# Altium PCB GNT604CPUR4.PCBDOC
Units mm, origin at the board's own origin, x right, y up, seen from the top; angles counter-clockwise.
Board outline 63 x 65.5 mm, 2 copper layers (Top Layer, Bottom Layer); 99 components, 67 nets, 288 pads, 76 vias.
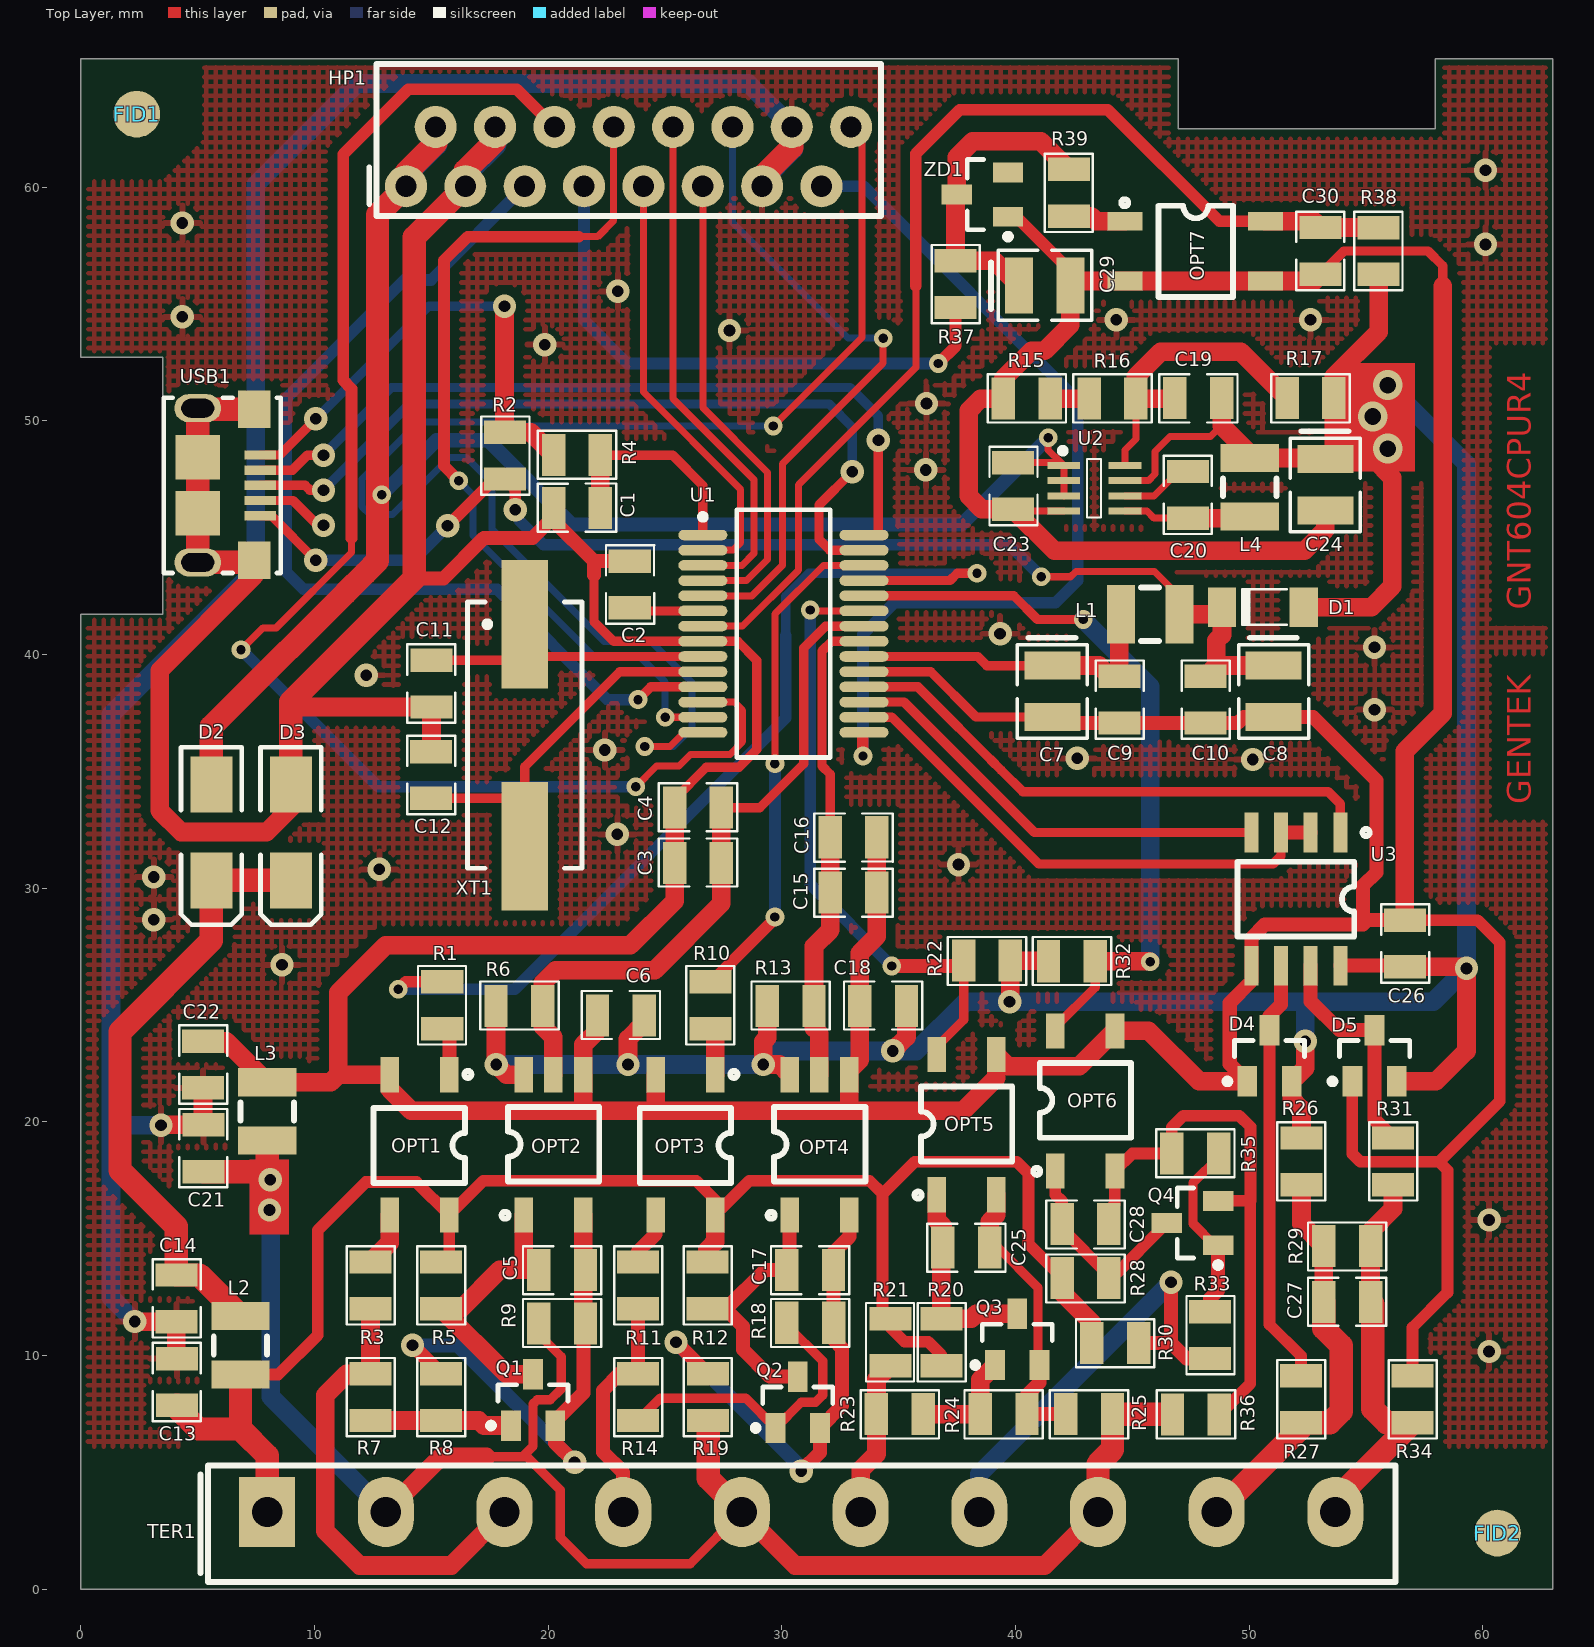
[diagram p0: Top Layer view]
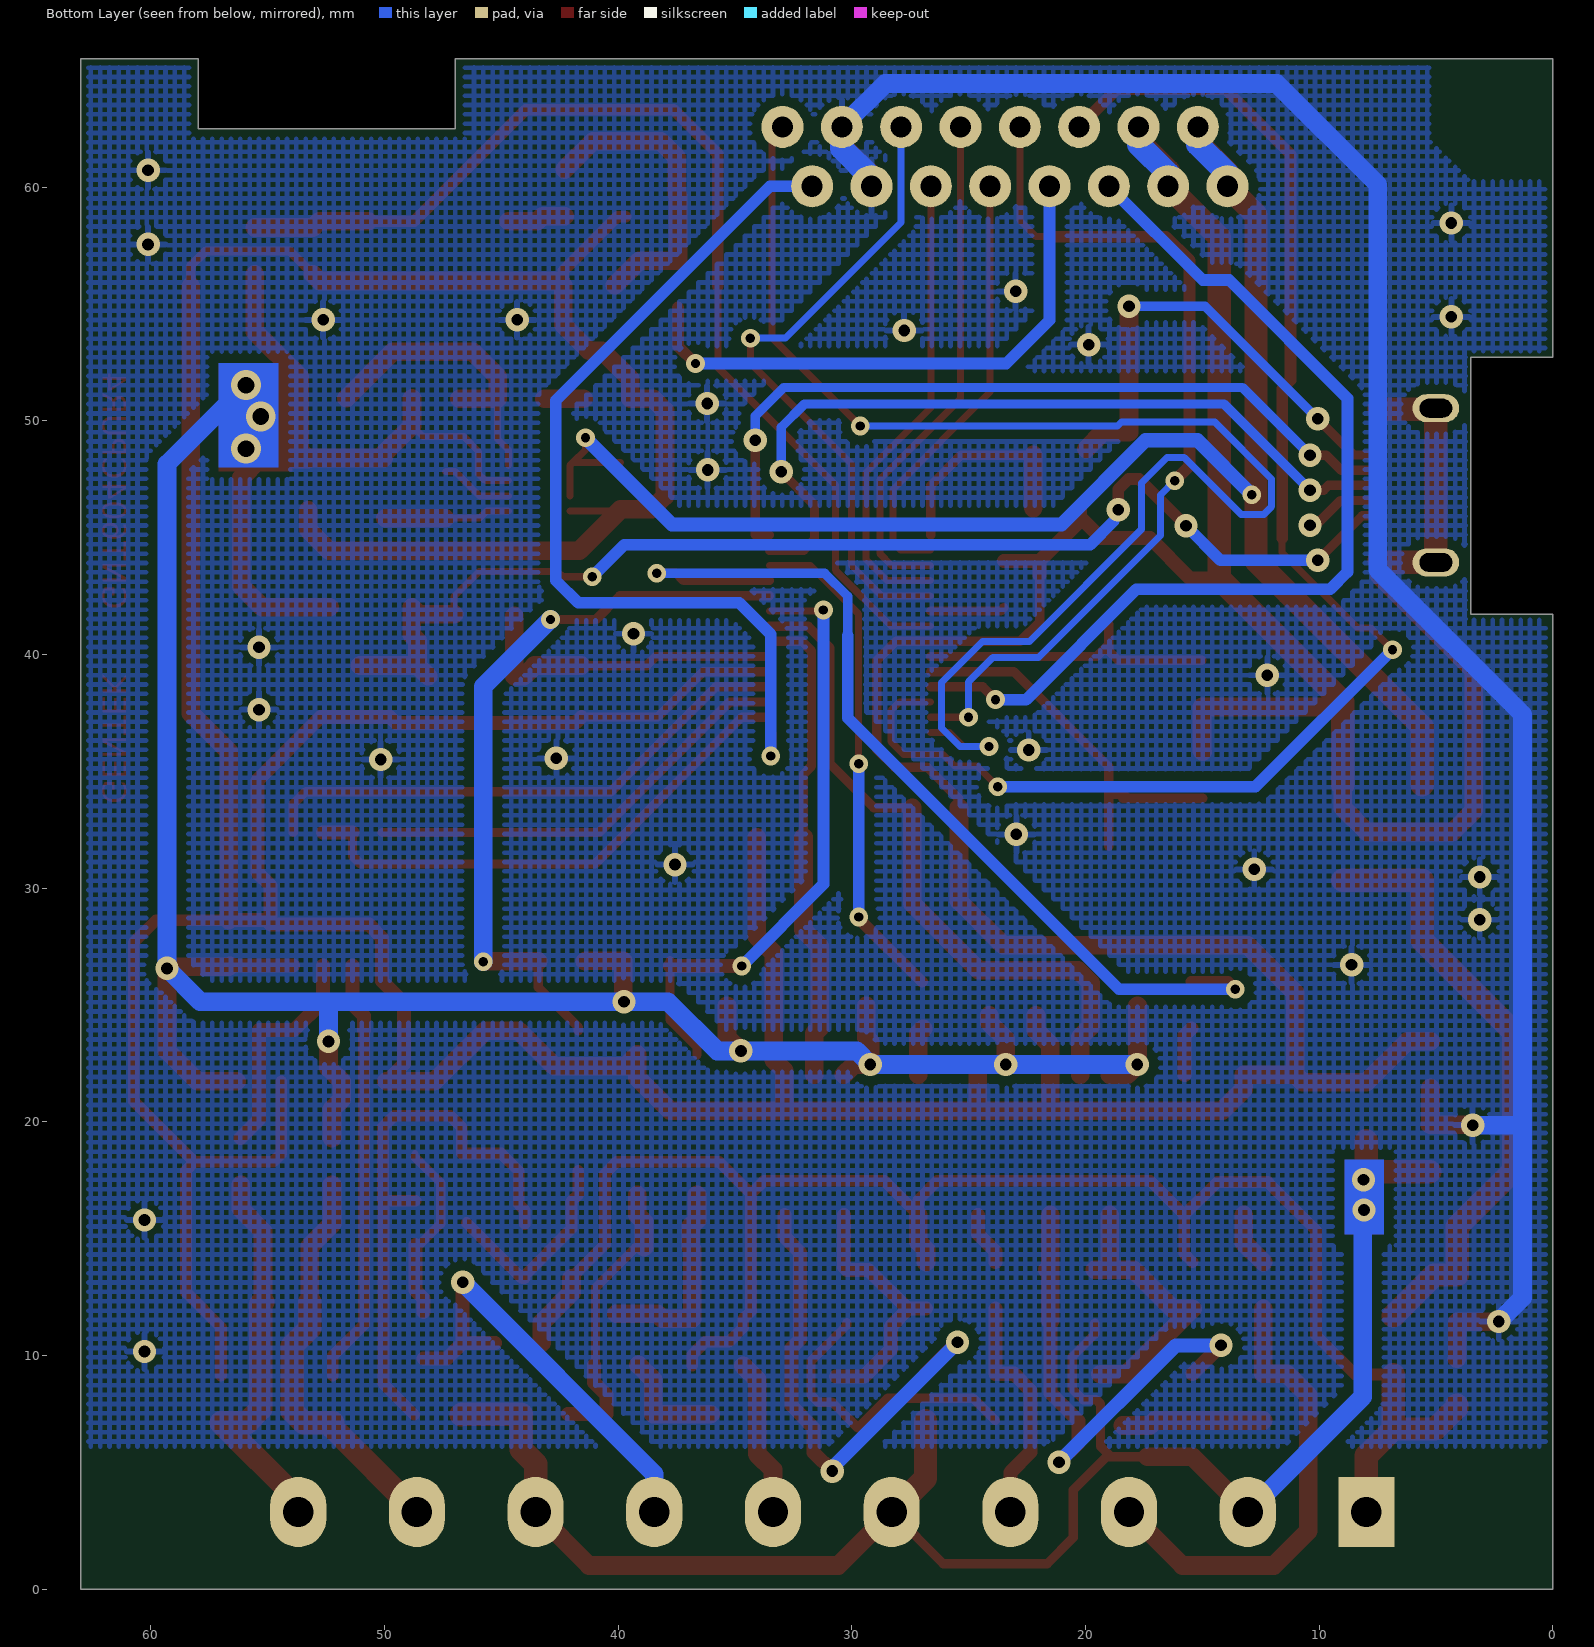
[diagram p1: Bottom Layer view, seen from below]

## Layer stack, top to bottom
Top Layer: signal copper 0.0356
Dielectric: dielectric 0.32, FR-4, Dk 4.8
Bottom Layer: signal copper 0.0356

## Board outline
0,0 63,0 63,65.5 57.969,65.5 57.969,62.5 46.969,62.5 46.969,65.5 0,65.5 0,52.73 3.5,52.73 3.5,41.732 0,41.732

## Design rules (kind name [scope] priority, off if disabled: settings)
Clearance [All] p1: gap=0.2
ComponentClearance [All] p1 off: gap=0.254 collisioncheckmode=3 verticalgap=0.254 showdistances=FALSE
FabricationTestPointUsage TestPointUsage [All] p1: valid=0 allowmultiple=FALSE
FabricationTestpoint Testpoint [All] p1: side=3 testpointundercomponent=TRUE minsize=1.016 maxsize=2.54 preferedsize=1.524 minholesize=0 maxholesize=1.016 preferedholesize=0.813 testpointgrid=0.025 allowsidetop=TRUE allowsidebottom=TRUE usegrid=TRUE gridtolerance=0
HoleSize [All] p1: absolutevalues=TRUE maxlimit=10 minlimit=0.025 maxpercent=80.000 minpercent=20.000
PolygonConnect [All] p1: connectstyle=Relief reliefconductorwidth=0.254 reliefentries=4 polygonreliefangle="90 Angle" airgapwidth=0.254
RoutingTopology [All] p1: topology=Horizontal
RoutingVias [All] p1: holewidth=0.4 width=0.8 viastyle="Through Hole" minholewidth=0.4 minwidth=0.8 maxholewidth=0.4 maxwidth=0.8
SilkToSolderMaskClearance SilkscreenOverComponentPads [IsPad] p1: minsilkscreentomaskgap=0.254 clearancetoexposedcopper=TRUE
SolderMaskExpansion [All] p1: expansion=0.102
Width [All] p1: maxlimit=3 minlimit=0.254 preferedwidth=0.3 minimp=50.000000 maximp=50.000000 favimp=50.000000
22 further rules are at their usual default settings.

## Components (designator, comment, footprint, x,y, rotation, side; value= is the part's Value field where it differs from the comment)
C1 "100nF" CC0805 21.234,46.279 r180 top
C2 "100nF" CC0805 23.495,43.002 r90 top
C3 "100pF" CC0805 26.416,31.09 r180 top
C4 "10nF" CC0805 26.416,33.45 r180 top
C5 "10nF" CC0805 20.599,13.665 r0 top
C6 "100nF" CC0805 23.114,24.562 r180 top
C7 "47uF/10V" CAPSMDTANTAL-B 41.58,38.43 r270 top
C8 "47uF/10V" CAPSMDTANTAL-B 51.054,38.43 r270 top
C9 "100nF" CC0805 44.45,38.071 r90 top
C10 "100nF" CC0805 48.133,38.071 r90 top
C11 "22pF" CC0805 15.011,38.76 r270 top
C12 "22pF" CC0805 14.985,34.849 r90 top
C13 "100nF" CC0805 4.115,8.865 r270 top
C14 "100nF" CC0805 4.088,12.446 r90 top
C15 "100pF" CC0805 33.071,29.821 r0 top
C16 "10nF" CC0805 33.071,32.182 r0 top
C17 "10nF" CC0805 31.217,13.665 r0 top
C18 "100nF" CC0805 34.341,24.967 r180 top
C19 "47pF" CC0805 47.828,50.978 r0 top
C20 "470nF" CC0805 47.396,46.838 r270 top
C21 "100nF" CC0805 5.258,18.872 r270 top
C22 "100nF" CC0805 5.231,22.454 r90 top
C23 "100nF" CC0805 39.903,47.219 r90 top
C24 "47uF/10V" CAPSMDTANTAL-B 53.264,47.269 r270 top
C25 "100nF" CC0805 37.897,14.63 r0 top
C26 "100nF" CC0805 56.667,27.635 r90 top
C27 "47pF" CC0805 54.202,12.294 r180 top
C28 "100nF" CC0805 43.001,15.621 r0 top
C29 "47uF/10V" CAPSMDTANTAL-B 41.25,55.804 r0 top
C30 "100nF" CC0805 53.061,57.278 r270 top
D1 "LL4148" CD-SOD80 52.248,42.037 r180 top
D2 "M7" CD-SMA_DO214 5.588,32.385 r270 top
D3 "US1M" CD-SMA_DO214 8.992,32.385 r270 top
D4 "BAV99" SOT23_N 50.876,22.784 r90 top
D5 "BAV99" SOT23_N 55.372,22.784 r90 top
FID1 "FIDUCIAL1" FIDUCIAL1 2.388,63.119 r0 top
FID2 "FIDUCIAL1" FIDUCIAL1 60.63,2.388 r0 top
HP1 "DS1015-05_CONFLY" HeaderAntenk90Pin16 13.919,60.046 r0 top (schematic designator HP2)
L1 "47uH" INDC2.5X3.3 45.771,41.732 r0 top
L2 "47uH" INDC2.5X3.3 6.833,10.439 r90 top
L3 "47uH" INDC2.5X3.3 7.976,20.447 r90 top
L4 "47uH" INDC2.5X3.3 50.038,47.168 r90 top
OPT1 "PC357" SO-4 14.503,19.011 r270 top
OPT2 "PC410" SO-5 18.955,16.017 r90 top
OPT3 "PC357" SO-4 25.889,19.011 r270 top
OPT4 "PC410" SO-5 30.341,16.017 r90 top
OPT5 "PC357" SO-4 37.897,19.887 r90 top
OPT6 "PC357" SO-4 42.977,20.904 r90 top
OPT7 "PC357" SO-4 47.701,57.277 r0 top
Q1 "BC817" SOT23_N 19.355,8.052 r90 top
Q2 "BC817" SOT23_N 30.683,7.95 r90 top
Q3 "BC817" SOT23_N 40.081,10.643 r90 top
Q4 "BC817" SOT23_N 47.625,15.672 r180 top
R1 "470R" CR0805 15.469,24.992 r270 top
R2 "10K" CR0805 18.161,48.514 r90 top
R3 "10K" CR0805 12.395,13.003 r90 top
R4 "100R" CR0805 21.234,48.539 r180 top
R5 "2.2K" CR0805 15.418,13.005 r90 top
R6 "1K" CR0805 18.771,24.968 r180 top
R7 "10K" CR0805 12.395,8.22 r90 top
R8 "10K" CR0805 15.418,8.22 r90 top
R9 "10R" CR0805 20.599,11.379 r180 top
R10 "470R" CR0805 26.949,24.992 r270 top
R11 "10K" CR0805 23.851,13.005 r90 top
R12 "2.2K" CR0805 26.824,13.005 r90 top
R13 "1K" CR0805 30.378,24.968 r180 top
R14 "10K" CR0805 23.851,8.22 r90 top
R15 "120K" CR0805 40.488,50.952 r180 top
R16 "10K" CR0805 44.158,50.954 r180 top
R17 "390K" CR0805 52.629,50.978 r0 top
R18 "10K" CR0805 31.218,11.403 r0 top
R19 "10R" CR0805 26.848,8.219 r270 top
R20 "2.2K" CR0805 36.83,10.569 r90 top
R21 "10K" CR0805 34.646,10.567 r270 top
R22 "10K" CR0805 38.786,26.899 r0 top
R23 "10K" CR0805 35.052,7.492 r0 top
R24 "10K" CR0805 39.497,7.492 r0 top
R25 "10R" CR0805 43.155,7.492 r0 top
R26 "10K" CR0805 52.246,18.312 r270 top
R27 "10R" CR0805 52.222,8.129 r90 top
R28 "2.2K" CR0805 43.002,13.31 r0 top
R29 "10K" CR0805 54.204,14.681 r0 top
R30 "10K" CR0805 44.272,10.541 r0 top
R31 "10R" CR0805 56.159,18.313 r90 top
R32 "10K" CR0805 42.418,26.875 r180 top
R33 "10K" CR0805 48.337,10.871 r90 top
R34 "10K" CR0805 56.998,8.128 r90 top
R35 "10K" CR0805 47.699,18.644 r180 top
R36 "10R" CR0805 47.727,7.468 r180 top
R37 "2,2K" CR0805 37.44,55.855 r90 top
R38 "10K" CR0805 55.55,57.277 r270 top
R39 "100R" CR0805 42.291,59.766 r270 top
TER1 "Terminal_H5.08x10" Terminal_H5.08x10 7.976,3.302 r0 top
U1 "PIC18F25K80-I/SS" SSOP-SS28_N 30.074,40.894 r0 top
U2 "LT3470ETS8" TS8_N 43.383,47.117 r0 top
U3 "SN75176BDR" SO-8 53.924,32.385 r270 top
USB1 "USB_MICRO" MICRO_USB 6.341,47.246 r0 top
XT1 "20MHz" HC49/4H_SMX 18.999,36.551 r270 top
ZD1 "ZNR5V1" SOT23_N 38.633,59.69 r180 top

## Footprints (in the part's own frame and the unit in brackets; to place one, negate y for a bottom-side part, rotate by r counter-clockwise, add the part's x,y. Pads: shape width x height; smd on the part's side, far side on the other; paste and mask are expansions set on the pad)
CAPSMDTANTAL-B [mm]
  rect 1.2x2.4 smd: 1(-1.1,0) 2(1.1,0)
  silkscreen extent -2.29,-1.5 2.01,1.5, body extent -1.82,-1.4 1.81,1.4, height 2
CC0805 [mm]
  rect 1x1.8 smd: 1(-1,0) 2(1,0)
  silkscreen extent -1.68,-1.04 1.68,1.01, body extent -1.12,-0.76 1.19,0.76, height 1
CD-SMA_DO214 [mm] "DO-214-AC/SMA; 2 C-Bend Leads; Body 5 x 2.7 mm, inc. leads (LxW)"
  rect 2.4x1.8 smd: 1(-2.05,0) 2(2.05,0)
  silkscreen extent -3.65,-1.3 3.95,1.3, body extent -2.69,-0.76 2.79,0.76, height 2
CD-SOD80 [mm]
  rect 1.2x1.7 smd: 1(-0.095,0.005) 2(3.405,0.005)
  silkscreen extent 0.64,-0.76 2.55,0.77, body extent -0.51,-0.76 3.68,0.76, height 2
CR0805 [mm]
  rect 1x1.8 smd: 1(-1,0) 2(1,0)
  silkscreen extent -1.68,-1.04 1.68,1.02, body extent -1.17,-0.76 1.22,0.79, height 0.4
FIDUCIAL1 [mm]
  round 2 smd mask+1: 1(0.003,0.013)
HC49/4H_SMX [mm] "Quartz Crystal, SM; Body 13.4 (inc. leads) x 4.9 mm (LxW max)"
  rect 5.5x2 smd: 1(-4.75,0) 2(4.75,0)
  silkscreen extent -5.7,-2.45 5.7,2.45, body extent -5.59,-2.34 5.59,2.34, height 2
HeaderAntenk90Pin16 [mm]
  round 1.8 hole 0.9: 1(0,0) 2(1.27,2.54) 3(2.54,0) 4(3.81,2.54) 5(5.08,0) 6(6.35,2.54) 7(7.62,0) 8(8.89,2.54) 9(10.16,0) 10(11.43,2.54) 11(12.7,0) 12(13.97,2.54) 13(15.24,0) 14(16.51,2.54) 15(17.78,0) 16(19.05,2.54)
  silkscreen extent -1.57,-1.27 20.32,5.23, body extent -1.02,-1.02 20.07,4.44, height 1
INDC2.5X3.3 [mm] "Chip Inductor, Body 4.5x1.6mm, IPC Low Density"
  rect 1.2x2.5 smd: 1(-1.25,0) 2(1.25,0)
  silkscreen extent -0.39,-1.14 0.38,1.14, body extent -1.86,-1.27 1.85,1.27, height 1.8
MICRO_USB [mm] "Connector; USB2.0, Type A, SM; 5 Position; Right Angle"
  rect 1.35x0.4 smd: 1(1.338,1.3) 2(1.338,0.65) 3(1.338,0) 4(1.338,-0.65) 5(1.338,-1.3)
  oval 2x1.2 hole 0.8 slot 1.4 at 0 deg: 6(-1.338,-3.3) 6(-1.338,3.3)
  rect 1.9x1.9 smd: 6(-1.338,-1.2) 6(-1.338,1.2)
  rect 1.4x1.6 smd: 6(1.088,-3.2) 6(1.088,3.25)
  silkscreen extent -2.79,-3.75 2.21,3.75
SO-4 [mm]
  rect 1.5x0.8 smd: 1(-3.006,1.267) 2(-3.006,-1.283) 3(2.994,-1.283) 4(2.994,1.267)
  silkscreen extent -3.17,-1.97 1.62,2.21, body extent -2.31,-2.31 2.39,2.26, height 1.75
SO-5 [mm]
  rect 1.5x0.8 smd: 1(0,0) 3(0,-2.55) 4(6,-2.55) 5(6,-1.27) 6(6,0)
  silkscreen extent -0.16,-3.23 4.62,0.94, body extent 0.63,-3.56 5.33,1.02, height 1.75
SO-8 [mm]
  rect 1.7x0.6 smd: 1(-0.001,-0.014) 2(-0.001,-1.284) 3(-0.001,-2.554) 4(-0.001,-3.824) 5(5.699,-3.824) 6(5.699,-2.554) 7(5.699,-1.284) 8(5.699,-0.014)
  silkscreen extent -0.15,-4.42 4.45,1.24, body extent 0.63,-4.7 5.08,0.79, height 1.75
SOT23_N [mm] "SOT23, 3-Leads, Body 2.9x1.3mm, Pitch 0.95mm, Lead Span 2.3mm, IPC Medium Density"
  rect 1.3x0.85 smd: 1(-1.05,0.95) 2(-1.05,-0.95) 3(1.143,0)
  silkscreen extent -1.17,-1.5 0.7,1.92, body extent -0.7,-1.5 0.7,1.5, height 1.14
SSOP-SS28_N [mm] "SOP, 28-Leads, Body 10.2x5.2mm, Pitch 0.65mm, IPC Medium Density"
  oval 2.1x0.45 smd: 1(-3.45,4.225) 2(-3.45,3.575) 3(-3.45,2.925) 4(-3.45,2.275) 5(-3.45,1.625) 6(-3.45,0.975) 7(-3.45,0.325) 8(-3.45,-0.325) 9(-3.45,-0.975) 10(-3.45,-1.625) 11(-3.45,-2.275) 12(-3.45,-2.925) 13(-3.45,-3.575) 14(-3.45,-4.225) 15(3.45,-4.225) 16(3.45,-3.575) 17(3.45,-2.925) 18(3.45,-2.275) 19(3.45,-1.625) 20(3.45,-0.975) 21(3.45,-0.325) 22(3.45,0.325) 23(3.45,0.975) 24(3.45,1.625) 25(3.45,2.275) 26(3.45,2.925) 27(3.45,3.575) 28(3.45,4.225)
  silkscreen extent -3.57,-5.3 2,5.3, body extent -2.7,-5.3 2.7,5.3, height 2
Terminal_H5.08x10 [mm]
  rect 2.4x3 hole 1.3: 1(0,0)
  oval 2.4x3 hole 1.3: 2(5.08,0) 3(10.16,0) 4(15.24,0) 5(20.32,0) 6(25.4,0) 7(30.48,0) 8(35.56,0) 9(40.64,0) 10(45.72,0)
  silkscreen extent -2.85,-3 48.3,2, body extent -2.36,-2.82 48.13,1.83, height 2
TS8_N [mm] "SOT23, 5-Leads, Body 3x1.6mm, Pitch 0.95mm, Lead Span 2.8mm, IPC Medium Density"
  rect 1.4x0.3 smd: 1(-1.31,0.975) 2(-1.31,0.325) 3(-1.31,-0.325) 4(-1.31,-0.975) 5(1.31,-0.975) 6(1.31,-0.325) 7(1.31,0.325) 8(1.31,0.975)
  silkscreen extent -1.48,-1.25 0.28,1.73, body extent -0.76,-1.44 0.74,1.46, height 1.45

## Part data
C1 C2 C3 C4 C5 C6 C9 C10 C11 C12 C13 C14 C15 C16 C17 C18 C19 C20 C21 C22 C23 C25 C26 C27 C28 C30: library part CC-0805, "Ceramic Chip Capacitor - Standard"
C7 C8 C24 C29: library part CAPSMDTANTAL-B, "CA45 Chip Tantalum Capacitors"
D1: library part CD-SOD80, "ChipDiode-MiniMELF-SOD80"
D2: library part CD-SMA_DO214, "ChipDiodeSMA"
D3: "ChipDiodeSMA, ultra fast diode"
D4 D5: "Ultrafast, Soft Recovery Diode"
HP1: library part "Header Antenk90PinF16", "Header, 16-Pin, 90 DEGREES"
L1 L2 L3 L4: library part "Inductor Iron_47uH", "Magnetic-Core Inductor_SMD"
OPT1 OPT3 OPT5 OPT6 OPT7: "Optoisolator"
OPT2 OPT4: "Ultra-high Speed Response  OPIC Photocoupler"
Q1 Q2 Q3 Q4: library part BC817-40, "NPN General Purpose Amplifier"
R1 R2 R3 R4 R5 R6 R7 R8 R9 R10 R11 R12 R13 R14 R15 R16 R17 R18 R19 R20 R21 R22 R23 R24 R25 R26 R27 R28 R29 R30 R31 R32 R33 R34 R35 R36 R37 R38 R39: library part CR-0805, "ChipResistor0805"
TER1: "Terminal Block Horizontal 5.08mm 10 pin"
U1: "Flash Microcontroller with 10-Bit A/D and nanoWatt Technology, 32K Flash, 28-Pin SSOP, Industrial Temperature Range, Tape and Reel"
U2: "200mA, Micropower Buck Regulator"
U3: "Low-Power,RS-485/RS-422 Transceiver"
USB1: "Connector; USB2.0, Type A, SM; 5 Position; Right Angle"
XT1: library part XTALL_SMD, "HS-XTALL(SMD)"
ZD1: library part ZENER2-SOT23, "Zener Diode"

## Via types
v1: diameter 1, hole 0.5, Top Layer to Bottom Layer, 52 vias
v2: diameter 0.8, hole 0.4, Top Layer to Bottom Layer, 21 vias
v3: diameter 1.27, hole 0.711, Top Layer to Bottom Layer, 3 vias

## Nets (pads, with @x,y where several pads share a name; then routed paths per layer and width w, separated by ;. In a path a pad name is that pad's centre, name@x,y a point inside that pad or via, vN(x,y) a via of type N, cw(c..) or ccw(c..) an arc to the next point about the centre after c; other vN are vias at no path point)
+5V: C6.1 C18.1 C19.2 C24.1 C26.1 D1.1 D4.2 D5.2 L4.2 OPT2.6 OPT4.6 R6.2 R13.2 R17.2 R22.2 R26.1 R32.2 R38.2 U2.7 U3.8 | length 136.9
  Top Layer w0.3: U2.7 45.689,47.442 45.974,47.727 45.974,48.692 46.609,49.327 48.355,49.327 48.828,49.8
  Top Layer w0.6: U3.8 C26.1@56.617,26.686
  Top Layer w0.8: R6.2 17.771,22.463 v1(17.78,22.454) 18.216,22.017 OPT2.6 ; v1(23.419,22.454) 23.419,23.546 24.114,24.241 C6.1 ; R13.2 29.378,23.597 29.21,23.428 v1(29.21,22.454) 29.904,22.454 OPT4.6 ; v1(34.747,23.038) 35.341,23.631 C18.1 ; v1(39.751,25.146) 39.786,25.181 R22.2 41.394,26.899 R32.2 ; C19.2 48.828,49.8 50.038,48.59 L4.2 53.215,48.418 C24.1 ; R26.1 52.246,20.55 51.826,20.97 D4.2 52.4,22.308 v1(52.4,23.444) ; D1.1 55.24,42.032 56.134,42.926 56.134,47.574 55.339,48.369 C24.1 ; R38.2 55.55,53.823 53.629,51.902 R17.2 53.629,48.734 C24.1 ; D5.2 58.005,21.734 59.309,23.038 v1(59.309,26.568) ; C26.1@56.617,26.686 C26.1 v1@59.242,26.635
  Bottom Layer w0.8: v1(17.78,22.454) v1(23.419,22.454) v1(29.21,22.454) 29.794,23.038 v1(34.747,23.038) 35.763,23.038 37.871,25.146 v1(39.751,25.146) 52.4,25.146 ; v1(52.4,23.444) 52.4,25.146 ; v3(55.931,51.537) 59.309,48.158 v1(59.309,26.568) 57.887,25.146 52.4,25.146
  other v3: 55.931,48.819 55.296,50.19
+18V: C23.2 D2.1 HP1.1 HP1.2 U2.1 U2.2 U2.3 | length 73.7
  Top Layer w0.3: C23.2 U2.1@41.947,48.219 ; v2(41.402,49.276) 41.402,48.763 U2.1@41.947,48.219 ; U2.3 U2.2 U2.1 U2.1@41.947,48.219
  Top Layer w1: D2.1 5.588,36.906 12.167,43.485 ; 11.316,42.634 12.167,43.485 ; HP1.2 15.189,61.9 13.919,60.63 HP1.1 12.7,58.826 12.7,44.018 12.167,43.485
  Bottom Layer w0.6: v2(12.878,46.838) 15.215,49.174 17.424,49.174 21.031,45.568 37.694,45.568 v2(41.402,49.276)
  Bottom Layer w1: HP1.1 13.919,60.579 15.189,61.849 HP1.2
DGND: C1.2 C2.2 C3.2 C4.2 C6.2 C7.2 C8.2 C9.1 C10.1 C11.2 C12.2 C15.2 C16.2 C18.2 C22.2 C23.1 C24.2 C26.2 C29.2 C30.2 D3.1 D4.1 D5.1 HP1.3 HP1.4 L3.2 OPT1.2 OPT2.4 OPT3.2 OPT4.4 OPT5.3 OPT6.3 OPT7.2 OPT7.3 R15.2 R34.2 U1.8 U1.19 U2.4 U3.5 USB1.6 ZD1.1 | length 353.1
  Top Layer w0.3: 32.891,20.475 32.893,20.472 ; C23.1@39.98,46.142 U2.4
  Top Layer w0.4: 21.962,43.409 21.962,41.411 22.804,40.569 U1.8 28.113,40.569 28.931,39.751 28.931,35.941 28.169,35.179 26.772,35.179 25.416,33.823 C4.2 ; U1.19 36.372,39.269 38.311,37.33 C7.2 ; C30.2 54.059,57.277 57.658,57.277 58.293,56.642 58.293,55.778
  Top Layer w0.5: ZD1.1 40.041,58.74 42.35,56.431 C29.2 ; D5.1 54.422,18.628 54.762,18.288 58.141,18.288 ; C26.2 59.782,28.635 60.731,27.686 60.731,20.879 58.141,18.288 ; R34.2 56.998,11.201 58.496,12.7 58.496,17.932 58.141,18.288
  Top Layer w0.6: 14.275,43.256 15.519,43.256 17.247,44.983 19.329,44.983 C1.2@20.234,45.888 ; C1.2 C1.2@20.234,45.888 ; 21.962,43.409 21.962,44.002 ; C2.2 21.962,44.002 ; C7.2 41.839,37.071 C9.1 C10.1 49.517,37.071 49.776,37.33 C8.2 52.738,37.33 55.448,34.62 55.448,30.683 54.88,30.115 54.88,28.448 ; D4.1 49.174,22.486 49.174,25.095 50.101,26.021 U3.5 50.101,27.876 50.673,28.448 54.88,28.448 ; C26.2 55.067,28.635 54.88,28.448 ; C1.2@20.234,45.888 20.234,45.729 21.962,44.002
  Top Layer w0.8: C22.2 6.219,23.454 L3.2 10.699,21.697 11.019,22.017 ; USB1.6@7.429,44.046 7.429,43.37 3.378,39.319 3.378,33.325 4.293,32.41 7.95,32.41 8.992,33.452 D3.1 ; 8.992,37.973 9.204,37.76 C11.2 15.011,35.876 C12.2 ; 21.505,20.481 OPT2.4 21.505,23.299 22.114,23.908 C6.2 ; 24.606,20.479 OPT3.2 ; C4.2 C3.2 25.416,29.455 23.52,27.559 13.056,27.559 11.019,25.522 11.019,22.017 ; 32.891,20.475 OPT4.4 32.891,22.197 33.341,22.647 C18.2 33.341,27.219 34.071,27.949 C15.2 C16.2 ; D4.1 47.862,21.734 45.698,23.898 OPT6.3 42.738,22.377 39.683,22.377 OPT5.3 39.179,21.882 37.77,20.472 32.893,20.472 14.148,20.472 13.221,21.399 OPT1.2 11.019,22.017 ; C30.2 52.777,55.994 OPT7.3 OPT7.2 42.54,55.994 C29.2 42.35,54.11 41.25,53.01 40.691,53.01 39.488,51.807 R15.2 38.506,50.952 37.998,50.444 37.998,46.787 38.567,46.219 C23.1 39.98,46.142 41.672,44.45 52.375,44.45 53.264,45.339 C24.2 ; C26.2 56.667,35.865 58.293,37.49 58.293,55.778
  Top Layer w1: USB1.6@7.429,44.046 7.329,43.946 5.004,43.946 5.004,46.046 5.004,48.446 5.004,50.546 5.054,50.496 USB1.6@7.429,50.496 ; D3.1 8.992,37.973 14.275,43.256 14.275,57.861 HP1.3 16.459,60.706 17.729,61.976 HP1.4
  Bottom Layer w1: HP1.3 16.459,60.579 17.729,61.849 HP1.4
NetC1_1: C1.1 R4.1 U1.1 | length 9.3
  Top Layer w0.4: R4.1 25.324,48.539 26.624,47.24 U1.1
  Top Layer w0.8: C1.1 R4.1
NetC2_1: C2.1 U1.6 | length 3.2
  Top Layer w0.4: C2.1 23.628,41.869 U1.6
NetC3_1: C3.1 C4.1 OPT2.5 R6.1 U1.22 | length 29.5
  Top Layer w0.4: C4.1 29.056,33.45 30.937,35.331 30.937,40.284 31.872,41.219 U1.22
  Top Layer w0.8: OPT2.5 20.225,23.632 19.771,24.086 R6.1 19.771,25.943 20.32,26.492 24.562,26.492 27.416,29.346 C3.1 C4.1
NetC5_1: C5.1 OPT2.1 Q1.3 R5.1 | length 12.3
  Top Layer w0.8: OPT2.1 18.955,13.7 18.99,13.665 ; Q1.3 18.228,9.195 R5.1 16.272,12.005 17.932,13.665 18.99,13.665 ; C5.1 18.99,13.665
NetC5_2: C5.2 OPT2.3 Q1.2 R8.2 R9.1 | length 26.8
  Top Layer w0.3: OPT2.3 21.599,15.171 C5.2 21.599,12.522 R9.1
  Top Layer w0.6: v1(14.198,10.439) R8.2 ; v1(21.133,5.436) 20.305,6.264 Q1.2 20.305,7.198 21.505,8.398 R9.1@21.505,11.499
  Top Layer w0.8: R9.1@21.505,11.499 OPT2.3 ; C5.2@21.612,13.678 C5.2@21.625,13.665
  Bottom Layer w0.6: v1(14.198,10.439) 16.129,10.439 v1(21.133,5.436)
NetC7_1: C7.1 C9.2 L1.1 U1.20 | length 14
  Top Layer w0.4: U1.20 38.389,39.919 38.778,39.53 C7.1 ; L1.1@44.45,41.661 L1.1
  Top Layer w0.8: C7.1 43.579,39.53 44.038,39.071 C9.2 L1.1@44.45,41.661
NetC8_1: C8.1 C10.2 D1.2 L1.2 R2.1 USB1.5 | length 52.4
  Top Layer w0.3: v2(41.112,43.332) 42.367,43.332 42.596,43.561 45.949,43.561 47.021,42.489 L1.2
  Top Layer w0.4: USB1.5 8.156,45.946 v1(10.058,44.044)
  Top Layer w0.5: v1(15.697,45.517) 17.694,47.514 R2.1 18.593,47.082 v1(18.593,46.203)
  Top Layer w0.8: L1.2 48.543,41.732 D1.2 48.843,40.842 48.593,40.592 C10.2@48.593,39.53 ; C10.2 C10.2@48.593,39.53 ; C8.1 C10.2@48.593,39.53
  Bottom Layer w0.5: v1(10.058,44.044) 14.224,44.044 v1(15.697,45.517) ; 18.786,45.72 19.802,44.704 39.741,44.704 v2(41.112,43.332)
NetC11_1: C11.1 U1.9 XT1.1 | length 13.1
  Top Layer w0.4: C11.1 18.602,39.76 18.999,40.157 XT1.1@18.999,40.437 ; XT1.1 XT1.1@18.999,40.437 ; U1.9 19.517,39.919 XT1.1@18.999,40.437
NetC12_1: C12.1 U1.10 XT1.2 | length 19.2
  Top Layer w0.3: XT1.2@18.288,33.96 18.999,33.96 XT1.2
  Top Layer w0.4: C12.1 18.399,33.849 XT1.2@18.288,33.96 ; XT1.2 18.999,35.204 23.064,39.269 U1.10
NetC13_2: C13.2 L2.1 OPT1.4 OPT3.4 R5.2 R12.2 R20.1 R21.1 R28.1 R30.1 TER1.1 | length 74.8
  Top Layer w0.5: L2.1 8.453,9.189 10.135,10.871 10.135,15.367 12.192,17.424 14.364,17.424 OPT1.4 ; R5.2 15.771,14.358 OPT1.4 ; R20.1 36.83,10.033 36.271,10.592 35.255,10.592 34.646,11.201 R21.1 34.315,11.898 34.315,16.916 ; R28.1 42.002,13.319 40.564,14.757 40.564,17.78 40.056,18.288 35.687,18.288 34.315,16.916 ; OPT1.4 17.229,17.475 26.34,17.475 27.156,16.659 OPT3.4 28.614,17.475 33.757,17.475 34.315,16.916
  Top Layer w0.8: R12.2 26.824,14.53 27.156,14.863 OPT3.4 ; R28.1 42.002,12.684 43.272,11.414 R30.1
  Top Layer w1: C13.2 4.115,7.772 5.029,6.858 6.833,6.858 ; L2.1 6.833,6.858 ; TER1.1 7.976,5.715 6.833,6.858
NetC14_2: C14.2 D2.2 D3.2 L2.2 | length 26.4
  Top Layer w1: L2.2 5.076,13.446 C14.2 4.088,15.521 1.676,17.932 1.676,23.851 5.588,27.762 D2.2 D3.2
NetC15_1: C15.1 C16.1 OPT4.5 R13.1 U1.21 | length 20.6
  Top Layer w0.4: C16.1 32.071,34.884 31.725,35.23 31.725,40.157 32.136,40.569 U1.21
  Top Layer w0.8: OPT4.5 31.611,23.787 31.378,24.019 R13.1 31.378,27.518 32.071,28.21 C15.1 C16.1
NetC17_1: C17.1 OPT4.1 Q2.3 R12.1 | length 11.4
  Top Layer w0.6: R12.1 R12.1@27.568,12.005 ; OPT4.1 30.341,13.789 C17.1 29.286,13.665 27.626,12.005 R12.1@27.568,12.005 ; Q2.3 29.489,9.093 28.334,10.249 28.334,11.239 R12.1@27.568,12.005
NetC17_2: C17.2 OPT4.3 Q2.2 R18.2 R19.1 | length 21.8
  Top Layer w0.6: v1(25.476,10.566) 25.5,10.566 R19.1 ; v1(30.836,5.055) 31.633,5.852 Q2.2 32.588,7.855 32.588,10.312 32.218,10.683 R18.2 32.217,11.405 C17.2 32.217,14.411 32.891,15.085 OPT4.3
  Bottom Layer w0.6: v1(25.476,10.566) 30.836,5.207 v1(30.836,5.055)
NetC19_1: C19.1 R16.1 R17.1 U2.8 | length 13.4
  Top Layer w0.3: U2.8 44.693,48.757 45.158,49.222 R16.1 ; C19.1@46.804,50.954 C19.1
  Top Layer w0.8: C19.1@46.804,50.954 R16.1 45.158,51.889 46.228,52.959 49.648,52.959 R17.1
NetC20_1: C20.1 U2.6 | length 3.1
  Top Layer w0.3: U2.6 45.928,46.792 46.974,47.838 C20.1
NetC20_2: C20.2 L4.1 U2.5 | length 5.5
  Top Layer w0.3: U2.5 45.628,46.142 45.933,45.838 C20.2 ; L4.1@49.958,45.838 L4.1
  Top Layer w0.8: C20.2 L4.1@49.958,45.838
NetC21_2: C21.2 L3.1 R9.2 R19.2 R25.2 R36.2 TER1.2 TER1.5 TER1.8 | length 76.4
  Top Layer w0.4: 17.348,5.664 18.898,5.664 ; R9.2 19.599,10.906 20.562,9.944 20.562,8.573 20.091,8.103 19.533,8.103 19.355,7.925 19.355,6.121 18.898,5.664 ; TER1.5 26.086,1.092 21.641,1.092 20.523,2.21 20.523,4.242 19.101,5.664 18.898,5.664
  Top Layer w0.8: v1@7.756,17.872 7.976,17.653 v1(8.103,17.526) ; TER1.2 15.418,5.664 17.348,5.664 ; TER1.5 30.582,1.016 41.25,1.016 TER1.8
  Top Layer w1: C21.2 v1@7.756,17.872 ; v1@7.976,17.653 L3.1 ; R19.2 26.848,4.75 TER1.5 ; TER1.8 43.536,5.359 44.155,5.978 R25.2 46.703,7.492 R36.2
  Bottom Layer w0.8: v1@8.128,17.094 8.128,8.23 TER1.2
  other v1: 8.077,16.231
NetC25_1: C25.1 OPT5.1 Q3.3 R20.2 | length 8.8
  Top Layer w0.8: OPT5.1 36.629,15.796 36.897,15.529 C25.1 36.83,14.564 R20.2 38.112,11.569 38.329,11.786 Q3.3
NetC25_2: C25.2 OPT5.2 Q3.2 R24.2 R25.1 | length 12.5
  Top Layer w0.4: C25.2 39.243,14.63 40.97,12.903 40.97,9.654 Q3.2
  Top Layer w0.6: Q3.2 41.031,8.849 40.497,8.315 R24.2 R25.1
  Top Layer w0.8: C25.2 38.897,15.732 39.179,16.015 OPT5.2
NetC27_1: C27.1 R29.2 R31.1 R34.1 TER1.10 | length 17.2
  Top Layer w0.8: C27.1 55.202,14.68 R29.2 55.204,15.326 56.159,16.281 R31.1
  Top Layer w1: TER1.10 53.696,3.826 R34.1 55.889,7.128 55.296,7.722 55.296,12.2 C27.1
NetC27_2: C27.2 R26.2 R27.1 R29.1 TER1.9 | length 17.7
  Top Layer w0.8: R26.2 52.246,15.638 R29.1 53.202,14.68 C27.2
  Top Layer w1: TER1.9 52.222,6.909 R27.1 53.459,7.129 53.95,7.62 53.95,10.414 53.202,11.161 C27.2
NetC28_1: C28.1 OPT6.1 Q4.3 R28.2 | length 9
  Top Layer w0.5: OPT6.1 41.709,16.888 42.001,16.597 C28.1 42.001,15.429 44.002,13.427 R28.2 44.12,13.31 Q4.3
NetC28_2: C28.2 OPT6.2 Q4.2 R35.2 R36.1 | length 25.7
  Top Layer w0.3: Q4.2 50.048,16.622 50.063,16.622
  Top Layer w0.5: C28.2 44.001,16.213 44.259,16.472 OPT6.2 45.005,18.644 R35.2 46.699,19.775 47.193,20.269 49.581,20.269 50.063,19.787 50.063,16.622 ; Q4.2 50.048,16.622 50.048,8.789 R36.1
NetC29_1: C29.1 R37.2 R39.1 ZD1.3 | length 13.2
  Top Layer w0.8: C29.1 39.099,56.855 R37.2 37.44,59.639 ZD1.3 37.49,61.29 38.176,61.976 41.081,61.976 R39.1
NetC30_1: C30.1 OPT7.4 R38.1 U1.7 | length 47.7
  Top Layer w0.3: U1.7 28.316,41.219 30.709,43.612 30.709,47.269 35.738,52.299 35.738,55.778
  Top Layer w0.5: 35.738,55.778 35.738,61.443 37.617,63.322 43.957,63.322 48.735,58.544 OPT7.4
  Top Layer w0.8: OPT7.4 52.795,58.544 C30.1 53.062,58.277 R38.1
NetD4_3: D4.3 R27.2 U3.6 | length 18.3
  Top Layer w0.5: D4.3 50.876,11.328 52.222,9.982 R27.2
  Top Layer w0.6: D4.3 50.876,24.536 51.371,25.031 U3.6
NetD5_3: D5.3 R31.2 U3.7 | length 9.7
  Top Layer w0.6: U3.7 52.641,25.16 53.873,23.927 D5.3 55.372,20.101 R31.2
NetHP1_5: HP1.5 U1.11 | length 41.7
  Top Layer w0.4: v2(23.851,38.075) 24.395,38.619 U1.11
  Bottom Layer w0.5: HP1.5 14.986,56.032 13.843,56.032 8.788,50.978 8.788,43.536 9.53,42.794 17.823,42.794 22.542,38.075 v2(23.851,38.075)
NetHP1_6: HP1.6 U1.12 | length 62.4
  Top Layer w0.3: v2(6.858,40.208) 7.798,41.148 8.365,41.148 11.582,44.366 11.582,44.983 ; v2(23.749,34.341) 24.638,35.23 25.603,35.23 26.102,35.729 27.779,35.729 28.321,36.271 28.321,37.617 27.969,37.969 U1.12
  Top Layer w0.5: 11.582,44.983 11.582,51.384 11.227,51.74 11.227,61.417 14.008,64.198 18.656,64.198 HP1.6
  Bottom Layer w0.5: v2(6.858,40.208) 12.725,34.341 v2(23.749,34.341)
NetHP1_7: HP1.7 R37.1 | length 24.4
  Top Layer w0.5: v2(36.693,52.459) 37.44,53.206 R37.1
  Bottom Layer w0.5: HP1.7 21.539,54.305 23.385,52.459 v2(36.693,52.459)
NetHP1_8: HP1.8 U1.13 | length 38.2
  Top Layer w0.3: 21.311,57.887 22.123,57.887 22.809,58.572 HP1.8 ; v2(25.009,37.319) U1.13
  Top Layer w0.5: v2(16.18,47.447) 15.545,48.082 15.545,56.871 16.561,57.887 21.311,57.887
  Bottom Layer w0.3: v2(16.18,47.447) 16.789,46.838 16.789,45.1 22.011,39.878 23.967,39.878 25.009,38.837 v2(25.009,37.319)
NetHP1_9: HP1.9 U1.2 | length 18.7
  Top Layer w0.3: HP1.9 24.079,51.232 28.245,47.066 28.245,44.798 27.916,44.469 U1.2
NetHP1_10: HP1.10 U1.3 | length 22.1
  Top Layer w0.3: HP1.10 25.349,50.952 28.804,47.498 28.804,44.323 28.3,43.819 U1.3
NetHP1_11: HP1.11 U1.4 | length 20.3
  Top Layer w0.3: HP1.11 26.619,50.571 29.388,47.803 29.388,44.069 28.488,43.169 U1.4
NetHP1_12: HP1.12 U1.5 | length 28
  Top Layer w0.3: U1.5 28.727,42.519 30.023,43.815 30.023,48.154 34.341,52.472 v2(34.341,53.543)
  Bottom Layer w0.3: HP1.12 27.889,58.496 32.842,53.543 v2(34.341,53.543)
NetHP1_15: HP1.15 U1.15 | length 38.9
  Top Layer w0.3: v2@33.467,35.672 v2(33.477,35.662) ; U1.15@33.467,36.612 U1.15
  Top Layer w0.5: v2@33.467,35.672 U1.15@33.467,36.612
  Bottom Layer w0.5: HP1.15 33.503,60.046 42.672,50.876 42.672,43.172 41.715,42.215 34.823,42.215 33.477,40.869 v2(33.477,35.662)
NetHP1_16: HP1.16 U1.14 | length 61.9
  Top Layer w0.3: v2(24.13,36.068) 25.222,36.068 25.823,36.669 U1.14 ; v2(29.642,49.784) 33.426,53.569 33.426,62.128 HP1.16
  Bottom Layer w0.3: v2(24.13,36.068) 25.375,36.068 26.162,36.855 26.162,38.811 24.409,40.564 22.403,40.564 17.602,45.364 17.602,47.346 16.51,48.438 15.773,48.438 13.335,45.999 12.37,45.999 12.04,46.33 12.04,47.523 14.465,49.949 18.466,49.949 18.631,49.784 v2(29.642,49.784)
NetOPT1_1: OPT1.1 R1.2 | length 2.1
  Top Layer w0.6: R1.2 15.771,23.69 OPT1.1
NetOPT1_3: OPT1.3 R3.2 | length 2.4
  Top Layer w0.8: R3.2 13.221,14.829 OPT1.3
NetOPT3_1: OPT3.1 R10.2 | length 2.1
  Top Layer w0.8: R10.2 27.156,23.785 OPT3.1
NetOPT3_3: OPT3.3 R11.2 | length 2.3
  Top Layer w0.6: R11.2 23.851,14.453 24.606,15.208 OPT3.3
NetOPT5_4: OPT5.4 R22.1 U1.23 | length 26.8
  Top Layer w0.3: v2(31.217,41.91) 31.258,41.869 U1.23 ; R22.1@37.786,26.67 R22.1
  Top Layer w0.4: OPT5.4 36.629,23.218 37.786,24.375 R22.1
  Top Layer w0.6: v2(34.711,26.67) R22.1@37.786,26.67
  Bottom Layer w0.5: v2(31.217,41.91) 31.217,30.165 v2(34.711,26.67)
NetOPT6_4: OPT6.4 R32.1 U1.24 | length 31.7
  Top Layer w0.3: v2@45.744,26.875 v2(45.771,26.848)
  Top Layer w0.4: U1.24 39.929,42.519 40.945,41.504 v2(42.901,41.504) ; OPT6.4 41.709,24.056 43.418,25.765 R32.1
  Top Layer w0.8: R32.1 v2@45.744,26.875
  Bottom Layer w0.8: v2(42.901,41.504) 45.771,38.633 v2(45.771,26.848)
NetOPT7_1: OPT7.1 R39.2 | length 2.5
  Top Layer w0.8: R39.2 43.24,58.766 43.462,58.544 OPT7.1
NetQ1_1: Q1.1 R7.1 R8.1 | length 6.1
  Top Layer w0.8: R7.1 R8.1 17.037,7.22 17.255,7.002 Q1.1
NetQ2_1: Q2.1 R14.1 R18.1 | length 13.1
  Top Layer w0.4: R14.1 24.809,8.179 28.455,8.179 Q2.1 30.834,8.001 31.445,8.001 31.75,8.306 31.75,9.765 30.218,11.297 R18.1
NetQ3_1: Q3.1 R23.2 R24.1 | length 4.8
  Top Layer w0.8: R23.2 R24.1 38.497,8.958 Q3.1
NetQ4_1: Q4.1 R33.2 R35.1 | length 7.9
  Top Layer w0.3: R35.1@48.699,18.49 R35.1
  Top Layer w0.4: Q4.1 48.524,14.722 47.6,15.646 47.6,17.39 R35.1@48.699,18.49
  Top Layer w0.6: R33.2 48.337,12.446 48.675,12.785 Q4.1
NetR1_1: R1.1 U1.25 | length 42.2
  Top Layer w0.4: U1.25 37.2,43.169 37.516,43.485 v2(38.354,43.485)
  Top Layer w0.5: v2(13.589,25.679) 13.902,25.992 R1.1
  Bottom Layer w0.4: 30.175,40.818 30.175,42.494 31.166,43.485 v2(38.354,43.485)
  Bottom Layer w0.5: v2(13.589,25.679) 18.567,25.679 30.175,37.287 30.175,40.818
NetR2_2: R2.2 R4.2 USB1.1 | length 20.6
  Top Layer w0.4: USB1.1 8.516,48.546 v1(10.058,50.089)
  Top Layer w0.8: R2.2@18.136,49.514 v1(18.136,54.915) ; R2.2 19.26,49.514 R4.2@19.971,48.803
  Bottom Layer w0.4: v1(10.058,50.089) 14.884,54.915 v1(18.136,54.915)
NetR3_1: R3.1 R7.2 TER1.3 | length 20.1
  Top Layer w0.8: R3.1 R7.2 11.379,9.22 10.465,8.306 10.465,2.489 11.938,1.016 15.85,1.016 TER1.3
NetR10_1: R10.1 U1.26 | length 21.6
  Top Layer w0.3: R10.1 R10.1@26.998,25.992 ; v2@29.708,28.702 v2(29.708,28.768) ; v2(29.708,35.331) 29.708,41.747 31.779,43.819 U1.26
  Top Layer w0.5: R10.1@26.998,25.992 v2@29.708,28.702
  Bottom Layer w0.5: v2(29.708,28.768) v2(29.708,35.331)
NetR11_1: R11.1 R14.2 TER1.4 | length 10.1
  Top Layer w0.6: TER1.4 23.216,5.004 22.352,5.867 22.352,8.509 23.063,9.22 R14.2 R11.1
NetR15_1: R15.1 R16.2 | length 1.7
  Top Layer w0.3: R16.2@43.157,50.952 R16.2
  Top Layer w0.8: R15.1 R16.2@43.157,50.952
NetR21_2: R21.2 R23.1 TER1.6 | length 6.8
  Top Layer w0.8: TER1.6 33.376,5.105 34.052,5.782 R23.1 34.052,8.974 R21.2
NetR30_2: R30.2 R33.1 TER1.7 | length 19.2
  Top Layer w0.6: R30.2 46.66,10.541 ; v1(46.66,13.132) 46.66,10.541 ; R33.1 47.33,9.871 46.66,10.541
  Bottom Layer w0.8: TER1.7 38.456,4.928 v1(46.66,13.132)
NetU1_16: U1.16 U3.2 U3.3 | length 22.9
  Top Layer w0.4: U1.16 34.715,37.319 40.996,31.039 51.029,31.039 51.371,31.381 U3.3
  Top Layer w0.6: U3.3 U3.2
NetU1_17: U1.17 U3.4 | length 19.7
  Top Layer w0.4: U1.17 35.234,37.969 39.04,34.163 ; 38.456,34.747 39.04,34.163 ; U3.4 40.817,32.386 39.04,34.163
NetU1_18: U1.18 U3.1 | length 24.3
  Top Layer w0.4: U1.18 35.828,38.619 39.395,35.052 ; 38.938,35.509 39.395,35.052 ; U3.1 53.911,33.604 53.377,34.138 40.31,34.138 39.395,35.052
NetU1_27: U1.27 USB1.3 | length 34.9
  Top Layer w0.4: USB1.3 9.599,47.246 9.804,47.041 v1(10.389,47.041) ; v1(33.02,47.828) 31.598,46.406 31.598,44.933 32.061,44.469 U1.27
  Bottom Layer w0.4: v1(10.389,47.041) 14.072,50.724 32.029,50.724 33.02,49.733 v1(33.02,47.828)
NetU1_28: U1.28 USB1.2 | length 34.1
  Top Layer w0.4: USB1.2 9.059,47.896 9.703,48.539 v1(10.389,48.539) ; U1.28 34.121,45.119 34.138,45.136 v1(34.138,49.174)
  Bottom Layer w0.4: v1(10.389,48.539) 13.284,51.435 32.918,51.435 34.138,50.216 v1(34.138,49.174)
NetUSB1_4: USB1.4 | length 3.1
  Top Layer w0.4: USB1.4 9.081,46.596 10.135,45.542 v1(10.389,45.542)
PE: C13.1 C14.1 C21.1 C22.1 HP1.13 HP1.14 | length 92.2
  Top Layer w0.8: v1(2.311,11.455) 2.321,11.446 C14.1 4.088,9.891 C13.1 ; v1(3.429,19.863) 3.438,19.872 C21.1 5.231,19.899 C22.1
  Top Layer w1: HP1.13 29.159,60.452 30.429,61.722 HP1.14
  Bottom Layer w0.8: v1(2.311,11.455) 1.295,12.471 1.295,19.863 ; v1(3.429,19.863) 1.295,19.863 ; HP1.14 28.575,64.44 11.811,64.44 7.493,60.122 7.493,43.637 1.295,37.44 1.295,19.863
  Bottom Layer w1: HP1.13 29.159,60.401 30.429,61.671 HP1.14
  other v1: 60.274,10.171 60.274,15.799 8.611,26.721 3.124,28.651 3.124,30.48 12.776,30.81 37.567,31.013 22.962,32.309 50.165,35.509 42.647,35.56 22.428,35.916 55.372,37.643 12.217,39.116 55.372,40.31 39.345,40.894 36.17,47.904 36.195,50.749 19.863,53.264 27.762,53.873 44.323,54.331 52.629,54.331 4.343,54.458 22.987,55.55 60.122,57.556 4.343,58.471 60.122,60.731
pads on no net: FID1.1 FID2.1 ZD1.2

## Polygon pours and split planes (outlines as drawn)
PE on Top Layer "Top Layer-No Net" (hatched 90Degree grid 0.4 track 0.2, remove dead copper, pour order 12): 0.33,60.249 3.556,60.249 3.886,60.579 5.283,61.976 5.283,62.509 5.283,65.126 46.558,65.126 46.558,62.078 58.369,62.078 58.369,65.126 62.687,65.126 62.687,6.096 0.305,6.096 0.305,41.478 3.708,41.478 3.734,41.478 3.734,52.984 0.33,52.984
PE on Bottom Layer "Top Layer-No Net" (hatched 90Degree grid 0.4 track 0.2, remove dead copper, pour order 14): 0.33,60.249 3.556,60.249 3.988,60.681 5.283,61.976 5.283,62.713 5.283,65.126 46.558,65.126 46.558,62.078 58.369,62.078 58.369,65.126 62.687,65.126 62.687,6.096 0.305,6.096 0.305,41.478 3.734,41.478 3.734,52.984 0.33,52.984

## Other copper
Top Layer:
  rectangle net +5V: 53.95,47.828 57.099,52.476
  rectangle net NetC21_2: 7.214,15.189 8.915,18.39
  text "GNT604CPUR4" at 62.052,41.91 h1 r90
  text "GENTEK" at 62.052,33.604 h1 r90
Bottom Layer:
  rectangle net +5V: 54.534,48.006 57.099,52.476
  rectangle net NetC21_2: 7.214,15.189 8.915,18.39

## Silkscreen, mask and mechanical layers (free items; w line width, h text height)
Mechanical 4:
  the board outline again, w0.254